# Altium PCB EFR32xG1x_DISC_WIDEBAND_REF_DES_A00_PCB_ASCII.PcbDoc (part 1 of 2)
Units mm, origin at the board's own origin, x right, y up, seen from the top; angles counter-clockwise.
Board outline 30 x 45 mm, 4 copper layers (Top Layer, Signal Layer 2, Signal Layer 3, Bottom Layer), stack 1.606 mm thick; 90 components, 90 nets, 338 pads, 387 vias.
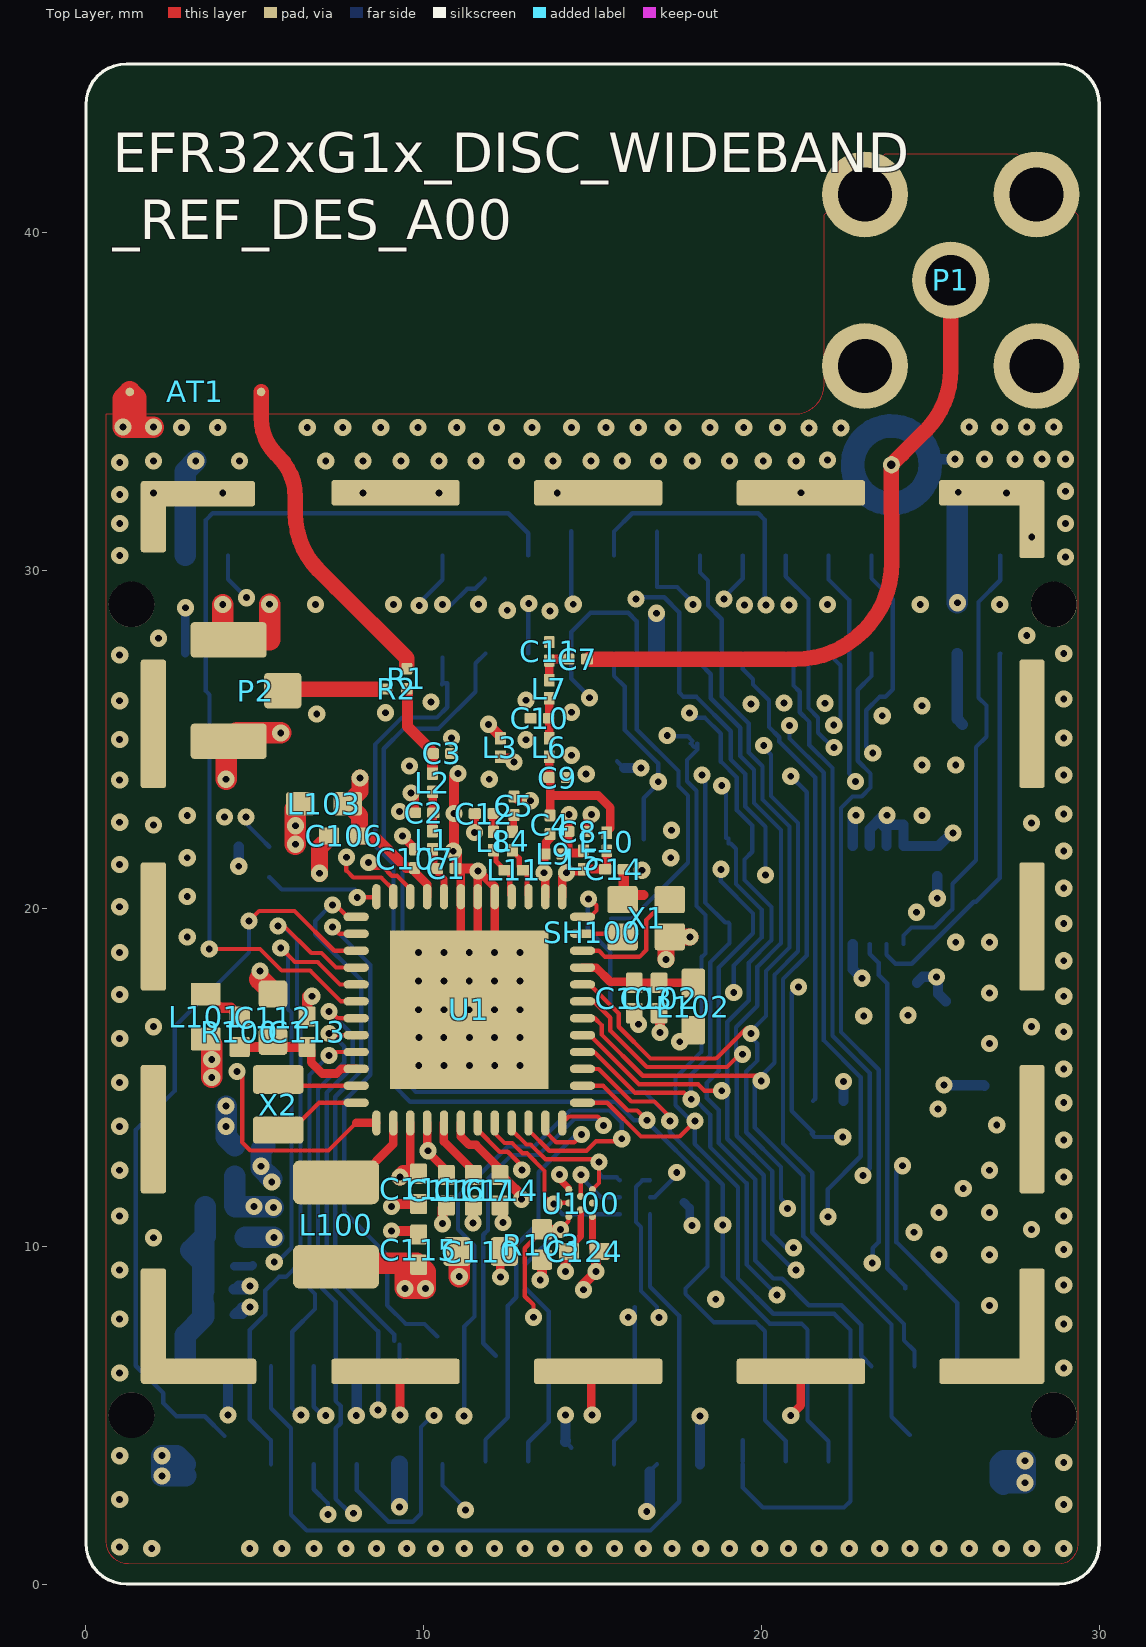
[diagram p0: Top Layer view]
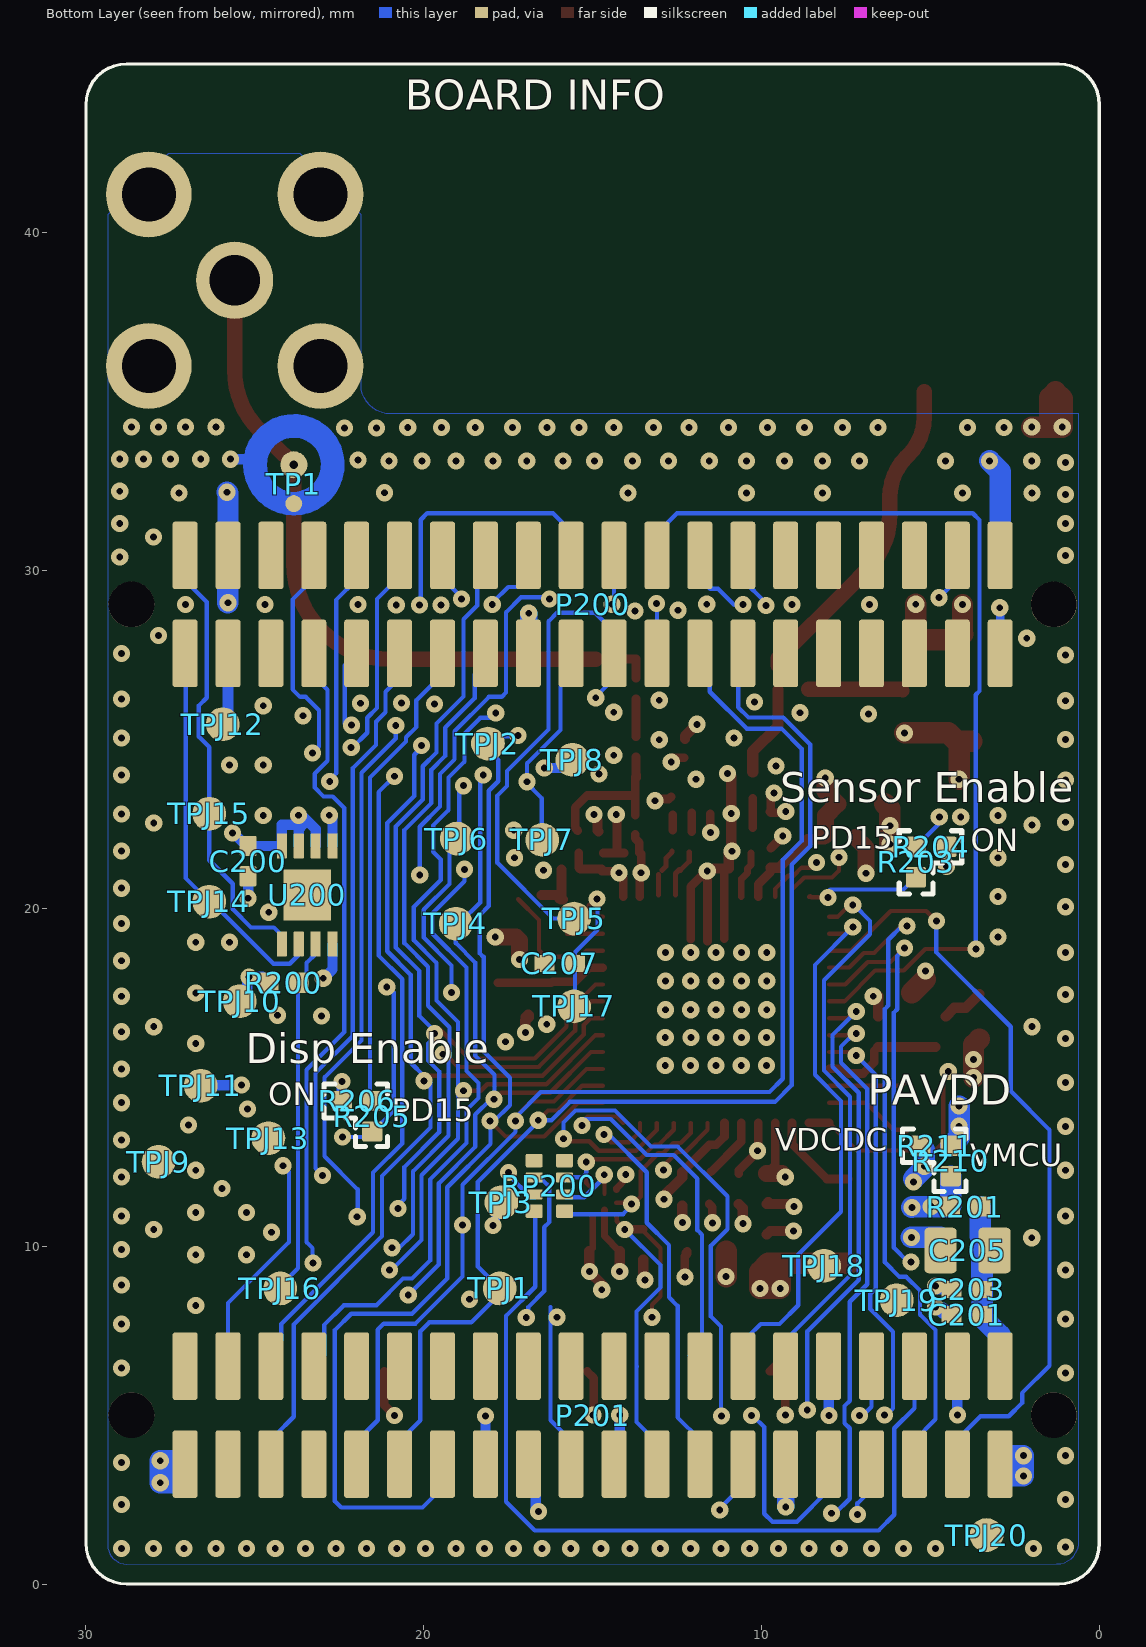
[diagram p1: Bottom Layer view, seen from below]
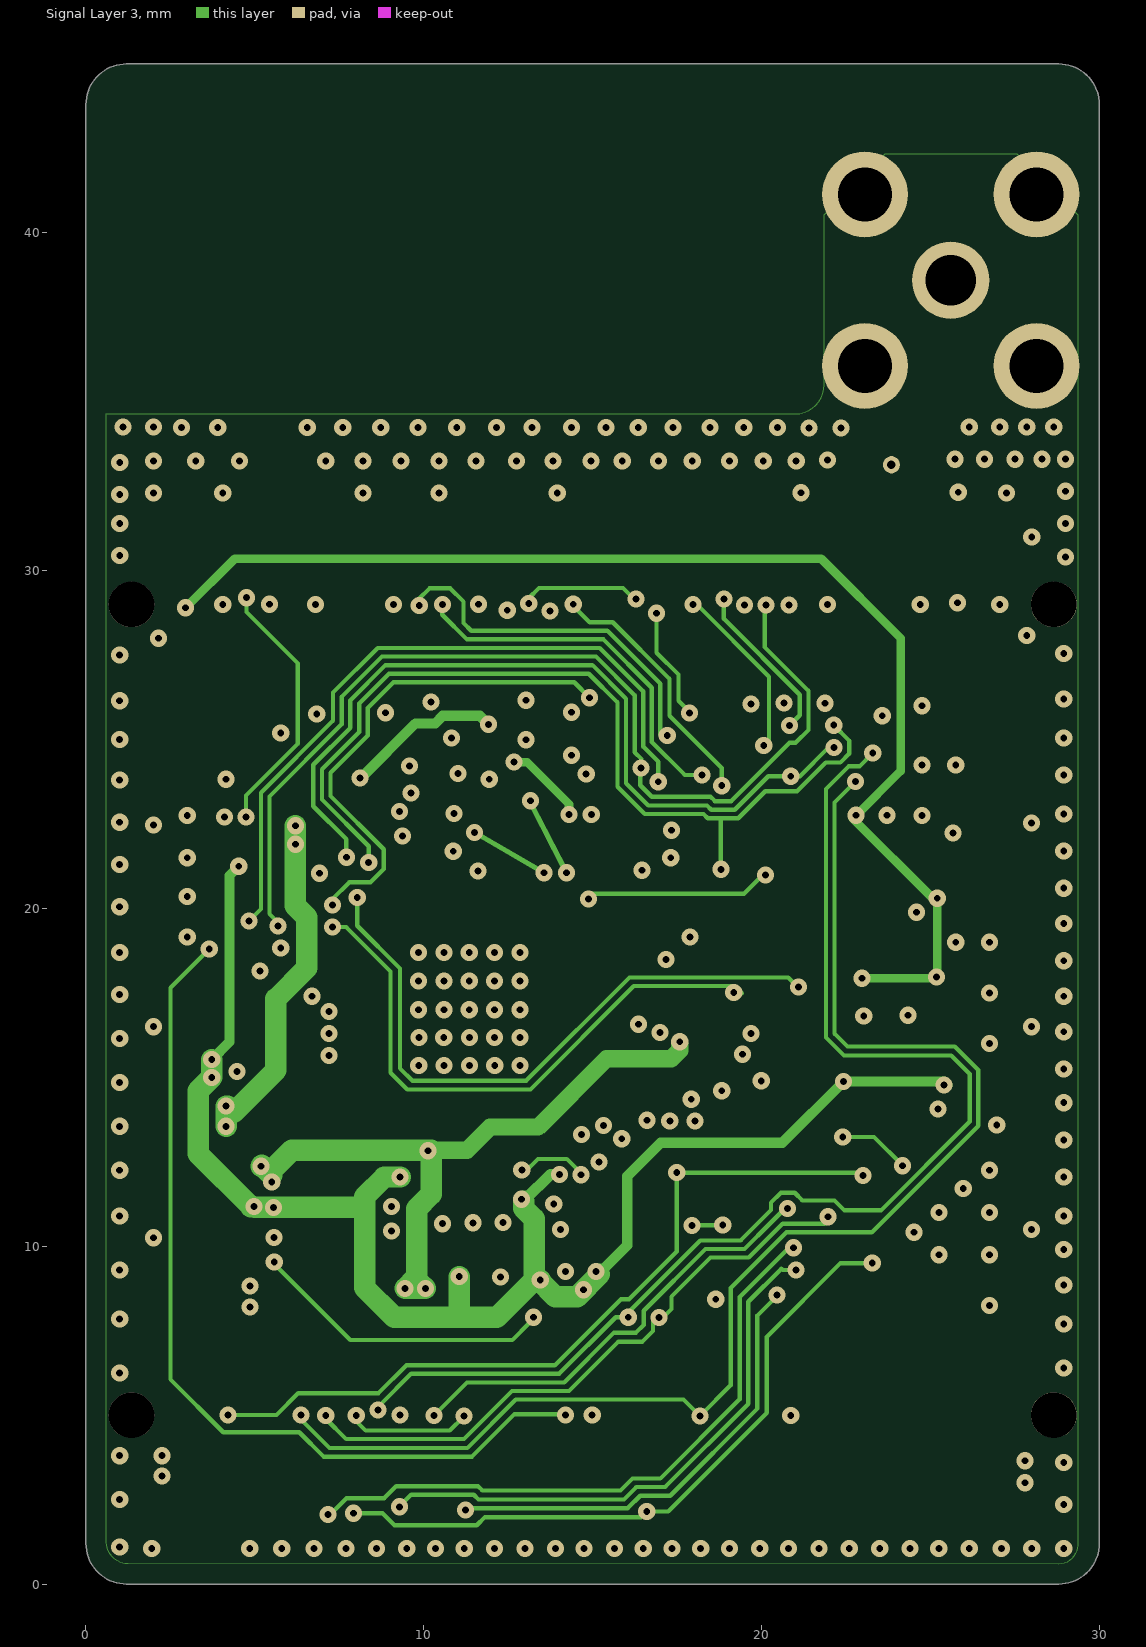
[diagram p2: Signal Layer 3]

## Layer stack, top to bottom
Top Solder: solder mask 0.01, Solder Resist, Dk 3.5
Top Layer: signal copper 0.035
Dielectric 1: core 0.3, FR-4, Dk 4.2
Signal Layer 2: signal copper 0.018
Dielectric 3: prepreg 0.9, Dk 4.2
Signal Layer 3: signal copper 0.018
Dielectric 2: core 0.3, FR-4, Dk 4.2
Bottom Layer: signal copper 0.035
Bottom Solder: solder mask 0.01, Solder Resist, Dk 3.5

## Board outline
0,1.2 ccw(c1.2,1.2) 1.2,0 28.8,0 ccw(c28.8,1.2) 30,1.2 30,43.8 ccw(c28.8,43.8) 28.8,45 1.2,45 ccw(c1.2,43.8) 0,43.8

## Design rules (kind name [scope] priority, off if disabled: settings)
AcuteAngle [All] p0: scope1count=1 scope1_0_kind=Board scope1_0_value=Board scope2count=1 scope2_0_kind=Board scope2_0_value=Board commentlength=0 minimum=6.50000000000000E+0001
AcuteAngle [All] p1: minimum=6.50000000000000E+0001 checktracksonly=FALSE
AssemblyTestPointUsage [All] p0: scope1count=1 scope1_0_kind=Board scope1_0_value=Board scope2count=1 scope2_0_kind=Board scope2_0_value=Board commentlength=0
AssemblyTestpoint [All] p0: scope1count=1 scope1_0_kind=Board scope1_0_value=Board scope2count=1 scope2_0_kind=Board scope2_0_value=Board commentlength=0
BoardOutlineClearance [All] p0: scope1count=1 scope1_0_kind=Board scope1_0_value=Board scope2count=1 scope2_0_kind=Board scope2_0_value=Board commentlength=0 gap=0.5
BoardOutlineClearance [All] p1: gap=0.5
Clearance Clearance_NPTH [All] p0: scope1count=1 scope1_0_kind=PadClass scope1_0_value=NPTH scope2count=1 scope2_0_kind=Board scope2_0_value=Board commentlength=0 gap=0.254
Clearance 50Ohm [All] p0: scope1count=1 scope1_0_kind=NetClass scope1_0_value=50Ohm scope2count=1 scope2_0_kind=Net scope2_0_value=GND commentlength=0 gap=0.254
Clearance Clearance_Net_AT1_1 [All] p0: scope1count=1 scope1_0_kind=Net scope1_0_value=NetAT1_1 scope2count=1 scope2_0_kind=Board scope2_0_value=Board commentlength=0 gap=0.25
Clearance Clearance_NetP2_1 [All] p0: scope1count=1 scope1_0_kind=Net scope1_0_value=NetP2_1 scope2count=1 scope2_0_kind=Board scope2_0_value=Board commentlength=0 gap=0.25
Clearance Clearance_NetC8 [All] p0: scope1count=1 scope1_0_kind=Net scope1_0_value=NetC8_1 scope2count=1 scope2_0_kind=Board scope2_0_value=Board commentlength=0 gap=0.25
Clearance [All] p0: scope1count=1 scope1_0_kind=Board scope1_0_value=Board scope2count=1 scope2_0_kind=Board scope2_0_value=Board commentlength=0 gap=0.127
Clearance 50Ohm [InNetClass('50Ohm') vs InNet('GND')] p1: gap=0.254
Clearance Clearance_NPTH [InPadClass('NPTH')] p2: gap=0.254
Clearance [All] p3: gap=0.127
Clearance Clearance_NetP2_1 [InNet('NetP2_1')] p4: gap=0.25
Clearance Clearance_NetC8 [InNet('NetC8_1')] p5: gap=0.25
Clearance Clearance_Net_AT1_1 [InNet('NetAT1_1')] p6: gap=0.25
ComponentClearance [All] p0 off: scope1count=1 scope1_0_kind=Board scope1_0_value=Board scope2count=1 scope2_0_kind=Board scope2_0_value=Board commentlength=0 gap=0.254 collisioncheckmode=3
ComponentClearance [All] p1 off: gap=0.254 collisioncheckmode=3 verticalgap=0.254 showdistances=FALSE
DiffPairsRouting [All] p0: scope1count=1 scope1_0_kind=Board scope1_0_value=Board scope2count=1 scope2_0_kind=Board scope2_0_value=Board commentlength=0
FabricationTestPointUsage [All] p0: scope1count=1 scope1_0_kind=Board scope1_0_value=Board scope2count=1 scope2_0_kind=Board scope2_0_value=Board commentlength=0 valid=0 allowmultiple=FALSE
FabricationTestpoint [All] p0: scope1count=1 scope1_0_kind=Board scope1_0_value=Board scope2count=1 scope2_0_kind=Board scope2_0_value=Board commentlength=0 side=3 testpointundercomponent=TRUE minsize=1.016 maxsize=2.54 preferedsize=1.524 minholesize=0 maxholesize=1.016 preferedholesize=0.813 testpointgrid=0.025
FanoutControl Fanout_BGA [All] p0 off: scope1count=1 scope1_0_kind=Board scope1_0_value=Board scope2count=1 scope2_0_kind=Board scope2_0_value=Board commentlength=69 // Protel DXP Scope 1 Expression Was: IsBGA   Fanout_BGA (Default Rule)
FanoutControl Fanout_LCC [All] p0 off: scope1count=1 scope1_0_kind=Board scope1_0_value=Board scope2count=1 scope2_0_kind=Board scope2_0_value=Board commentlength=69 // Protel DXP Scope 1 Expression Was: IsLCC   Fanout_LCC (Default Rule)
FanoutControl Fanout_SOIC [All] p0 off: scope1count=1 scope1_0_kind=Board scope1_0_value=Board scope2count=1 scope2_0_kind=Board scope2_0_value=Board commentlength=71 // Protel DXP Scope 1 Expression Was: IsSOIC   Fanout_SOIC (Default Rule)
FanoutControl Fanout_Small [All] p0 off: scope1count=1 scope1_0_kind=Board scope1_0_value=Board scope2count=1 scope2_0_kind=Board scope2_0_value=Board commentlength=84 // Protel DXP Scope 1 Expression Was: (CompPinCount < 5)   Fanout_Small (Default Rule)
FanoutControl Fanout_Default [All] p0: scope1count=1 scope1_0_kind=Board scope1_0_value=Board scope2count=1 scope2_0_kind=Board scope2_0_value=Board commentlength=30 // Fanout_Default (Default Rule)
Height [All] p0: scope1count=1 scope1_0_kind=Board scope1_0_value=Board scope2count=1 scope2_0_kind=Board scope2_0_value=Board commentlength=0
HoleSize [All] p0: scope1count=1 scope1_0_kind=Board scope1_0_value=Board scope2count=1 scope2_0_kind=Board scope2_0_value=Board commentlength=0 absolutevalues=TRUE maxlimit=2.54 minlimit=0.025 maxpercent=80.000 minpercent=20.000
HoleToHoleClearance HoleToHoleClearance_ANT1toPAD [All] p0 off: scope1count=1 scope1_0_kind=Board scope1_0_value=Board scope2count=1 scope2_0_kind=Board scope2_0_value=Board commentlength=44 // Protel DXP Scope 2 Expression Was: ISpad
HoleToHoleClearance [All] p0: scope1count=1 scope1_0_kind=Board scope1_0_value=Board scope2count=1 scope2_0_kind=Board scope2_0_value=Board commentlength=0
HoleToHoleClearance HoleToHoleClearance_U1toVIA_1 [All] p0 off: scope1count=1 scope1_0_kind=Board scope1_0_value=Board scope2count=1 scope2_0_kind=Board scope2_0_value=Board commentlength=44 // Protel DXP Scope 2 Expression Was: IsVia
HoleToHoleClearance HoleToHoleClearance_ANT1toPAD [Incomponent ('ANT1') vs ISpad] p1: gap=0 allowstackedmicrovias=TRUE
HoleToHoleClearance HoleToHoleClearance_U1toVIA_1 [InComponent ('U1') vs IsVia] p2: gap=0 allowstackedmicrovias=TRUE
HoleToHoleClearance [All] p3: gap=0.254 allowstackedmicrovias=TRUE
LayerPairs [All] p0: scope1count=1 scope1_0_kind=Board scope1_0_value=Board scope2count=1 scope2_0_kind=Board scope2_0_value=Board commentlength=0 enforce=TRUE
MinimumSolderMaskSliver [All] p0: scope1count=1 scope1_0_kind=Board scope1_0_value=Board scope2count=1 scope2_0_kind=Board scope2_0_value=Board commentlength=0
MinimumSolderMaskSliver [All] p1: minsoldermaskwidth=0.102
NetAntennae [All] p0: scope1count=1 scope1_0_kind=Board scope1_0_value=Board scope2count=1 scope2_0_kind=Board scope2_0_value=Board commentlength=0
PasteMaskExpansion [All] p0: scope1count=1 scope1_0_kind=Board scope1_0_value=Board scope2count=1 scope2_0_kind=Board scope2_0_value=Board commentlength=0 expansion=0
PlaneClearance [All] p0: scope1count=1 scope1_0_kind=Board scope1_0_value=Board scope2count=1 scope2_0_kind=Board scope2_0_value=Board commentlength=0 clearance=0.508
PlaneConnect [All] p0: scope1count=1 scope1_0_kind=Board scope1_0_value=Board scope2count=1 scope2_0_kind=Board scope2_0_value=Board commentlength=0 planeconnectstyle=Relief reliefexpansion=0.508 reliefentries=4 reliefconductorwidth=0.254 reliefairgap=0.254
PolygonConnect PolygonConnect_GND [All] p0: scope1count=1 scope1_0_kind=Net scope1_0_value=GND scope2count=1 scope2_0_kind=Board scope2_0_value=Board commentlength=0 connectstyle=Relief reliefconductorwidth=0.203 reliefentries=4 polygonreliefangle="90 Angle"
PolygonConnect PolygonConnect_P1 [All] p0: scope1count=1 scope1_0_kind=Component scope1_0_value=P1 scope2count=1 scope2_0_kind=Board scope2_0_value=Board commentlength=0 connectstyle=Relief reliefconductorwidth=0.305 reliefentries=4 polygonreliefangle="90 Angle"
PolygonConnect PolygonConnect_SH100 [All] p0: scope1count=1 scope1_0_kind=Component scope1_0_value=SH100 scope2count=1 scope2_0_kind=Board scope2_0_value=Board commentlength=0 connectstyle=Direct reliefconductorwidth=0.254 reliefentries=4 polygonreliefangle="90 Angle"
PolygonConnect Polygon_VIA_Connect [All] p0 off: scope1count=1 scope1_0_kind=Board scope1_0_value=Board scope2count=1 scope2_0_kind=Board scope2_0_value=Board commentlength=44 connectstyle=Direct reliefconductorwidth=0.254 reliefentries=4 polygonreliefangle="90 Angle" // Protel DXP Scope 1 Expression Was: IsVia
PolygonConnect PolygonConnect_SH100 [InComponent('SH100')] p1: connectstyle=Direct reliefconductorwidth=0.254 reliefentries=4 polygonreliefangle="90 Angle" airgapwidth=0.127
PolygonConnect PolygonConnect_P1 [InComponent('P1')] p2: connectstyle=Relief reliefconductorwidth=0.305 reliefentries=4 polygonreliefangle="90 Angle" airgapwidth=0.127
PolygonConnect Polygon_VIA_Connect [IsVia] p3: connectstyle=Direct reliefconductorwidth=0.254 reliefentries=4 polygonreliefangle="90 Angle" airgapwidth=0.254
PolygonConnect PolygonConnect_GND [InNet('GND')] p4: connectstyle=Relief reliefconductorwidth=0.203 reliefentries=4 polygonreliefangle="90 Angle" airgapwidth=0.127
RoutingCorners [All] p0: scope1count=1 scope1_0_kind=Board scope1_0_value=Board scope2count=1 scope2_0_kind=Board scope2_0_value=Board commentlength=0 cornerstyle=45-Degree minsetback=2.54 maxsetback=2.54
RoutingLayers [All] p0: scope1count=1 scope1_0_kind=Board scope1_0_value=Board scope2count=1 scope2_0_kind=Board scope2_0_value=Board commentlength=0 top layer=Automatic mid layer 1=Automatic mid layer 2=Automatic bottom layer=Automatic
RoutingPriority [All] p0: scope1count=1 scope1_0_kind=Board scope1_0_value=Board scope2count=1 scope2_0_kind=Board scope2_0_value=Board commentlength=0
RoutingTopology [All] p0: scope1count=1 scope1_0_kind=Board scope1_0_value=Board scope2count=1 scope2_0_kind=Board scope2_0_value=Board commentlength=0 topology=Shortest
RoutingVias [All] p0: scope1count=1 scope1_0_kind=Board scope1_0_value=Board scope2count=1 scope2_0_kind=Board scope2_0_value=Board commentlength=0 holewidth=0.25 width=0.508 viastyle="Through Hole" minholewidth=0.25 minwidth=0.508 maxholewidth=1 maxwidth=1.5
RoutingVias [All] p1: holewidth=0.25 width=0.508 viastyle="Through Hole" minholewidth=0.25 minwidth=0.508 maxholewidth=1 maxwidth=1.5
ShortCircuit [All] p0 off: scope1count=1 scope1_0_kind=Board scope1_0_value=Board scope2count=1 scope2_0_kind=Board scope2_0_value=Board commentlength=44 allowed=TRUE // Protel DXP Scope 2 Expression Was: ispad
ShortCircuit [IsVia vs ispad] p1: allowed=TRUE
SilkToBoardRegionClearance [All] p0: scope1count=1 scope1_0_kind=Board scope1_0_value=Board scope2count=1 scope2_0_kind=Board scope2_0_value=Board commentlength=0
SilkToSilkClearance [All] p0: scope1count=1 scope1_0_kind=Board scope1_0_value=Board scope2count=1 scope2_0_kind=Board scope2_0_value=Board commentlength=0
SilkToSilkClearance [All] p1: silktosilkclearance=0.102
SilkToSolderMaskClearance [All] p0 off: scope1count=1 scope1_0_kind=Board scope1_0_value=Board scope2count=1 scope2_0_kind=Board scope2_0_value=Board commentlength=44 // Protel DXP Scope 1 Expression Was: IsPad
SilkToSolderMaskClearance [IsPad] p1: minsilkscreentomaskgap=0.102 clearancetoexposedcopper=TRUE
SolderMaskExpansion [All] p0: scope1count=1 scope1_0_kind=Board scope1_0_value=Board scope2count=1 scope2_0_kind=Board scope2_0_value=Board commentlength=0 expansion=0.051
SolderMaskExpansion [All] p1: expansion=0.051
UnRoutedNet [All] p0: scope1count=1 scope1_0_kind=Board scope1_0_value=Board scope2count=1 scope2_0_kind=Board scope2_0_value=Board commentlength=0
UnpouredPolygon [All] p0: scope1count=1 scope1_0_kind=Board scope1_0_value=Board scope2count=1 scope2_0_kind=Board scope2_0_value=Board commentlength=0
Width [All] p0: scope1count=1 scope1_0_kind=Board scope1_0_value=Board scope2count=1 scope2_0_kind=Board scope2_0_value=Board commentlength=0 maxlimit=5.08 minlimit=0.102 preferedwidth=0.127
Width [All] p1: maxlimit=5.08 minlimit=0.102 preferedwidth=0.127
24 further rules are at their usual default settings.

## Classes and differential pairs
net class 50Ohm: NetAT1_1 NetP2_1 Tline
pad class NPTH: P200-M1 P200-M2 P201-M1 P201-M2
component class "01_ Title Page": PCB1
component class "02_ RF, Antenna & Power": AT1 C1 C2 C3 C4 C5 C7 C8 C9 C10 C11 C12 C14 C102 C103 C106 C107 C110 C111 C112 C113 C114 C115 C116 C117 L1 L2 L3 L4 L5 L6 L7 L8 L9 L10 L11 L100 L101 L102 L103 P1 P2 R1 R2 R100 R210 R211 SH100 TP1 X1 X2
component class "03_ EFR32 Signal Assign": C124 C207 R103 R203 R204 R205 R206 RP200 U1 U100
component class "04_ WSTK Connectors & B": C200 C201 C203 C205 P200 P201 R200 R201 TPJ1 TPJ2 TPJ3 TPJ4 TPJ5 TPJ6 TPJ7 TPJ8 TPJ9 TPJ10 TPJ11 TPJ12 TPJ13 TPJ14 TPJ15 TPJ16 TPJ17 TPJ18 TPJ19 TPJ20 U200
net class RADIO_PA[5..0]: RADIO_PA0 RADIO_PA1 RADIO_PA2 RADIO_PA3 RADIO_PA4 RADIO_PA5
net class RADIO_PB[15..11]: RADIO_PB11 RADIO_PB12 RADIO_PB13 RADIO_PB14 RADIO_PB15
net class RADIO_PC[11..6]: RADIO_PC6 RADIO_PC7 RADIO_PC8 RADIO_PC9 RADIO_PC10 RADIO_PC11
net class RADIO_PD[15..13]: RADIO_PD13 RADIO_PD14 RADIO_PD15
net class RADIO_PF[7..0]: RADIO_PF0 RADIO_PF1 RADIO_PF2 RADIO_PF3 RADIO_PF4 RADIO_PF5 RADIO_PF6 RADIO_PF7
net class WSTK_F[21..0]: WSTK_F4 WSTK_F14 WSTK_F15 WSTK_F16
net class WSTK_P[45..0]: WSTK_P3 WSTK_P15 WSTK_P17 WSTK_P19 WSTK_P21 WSTK_P23 WSTK_P25 WSTK_P27 WSTK_P29 WSTK_P30 WSTK_P34 WSTK_P36 WSTK_P37 WSTK_P38 WSTK_P39 WSTK_P40 WSTK_P41 WSTK_P42 WSTK_P43 WSTK_P44 WSTK_P45

## Components (designator, comment, footprint, x,y, rotation, side; value= is the part's Value field where it differs from the comment)
AT1 "INVERTED_F" ANT_INV_F_2.4_GHZ_17.3MM_MIR 0.79,34.84 r0 top locked net-tie
C1 "?" C0201_L 10.668,21.184 r180 top
C2 "?" C0201_L 10.008,22.835 r0 top
C3 "?" C0201_L 10.541,24.587 r180 top
C4 "?" C0201_L 13.741,22.479 r90 top
C5 "?" C0201_L 12.675,23.038 r90 top
C7 "?" C0201_L 14.554,27.381 r0 top
C8 "?" C0201_L 14.554,22.276 r180 top
C9 "?" C0201_L 13.97,23.876 r0 top
C10 "?" C0201_L 13.437,25.629 r180 top
C11 "?" C0201_L 13.716,27.61 r90 top
C12 "?" C0201_L 11.786,22.809 r180 top
C14 "?" C0201_L 15.646,21.158 r0 top
C102 "100P" C0402_L 16.967,17.348 r270 top
C103 "10P" C0402_L 16.231,17.348 r270 top
C106 "220N" C0402_L 7.645,22.149 r180 top
C107 "10P" C0201_L 9.728,21.476 r90 top
C110 "10U" C0603_L 11.684,9.842 r0 top
C111 "1U" C0402_L 9.848,11.7 r270 top
C112 "10U" C0603_L 5.537,16.764 r90 top
C113 "10N" C0402_L 6.548,16.35 r90 top
C114 "1U" C0402_L 12.255,11.659 r270 top
C115 "1U" C0402_L 9.85,9.9 r90 top
C116 "100N" C0402_L 10.668,11.659 r270 top
C117 "1U" C0402_L 11.468,11.659 r270 top
C124 "100N" C0402_L 14.75,9.85 r180 top
C200 "100N" C0402_L 25.2,21.4 r90 bottom
C201 "100N" C0402_L 3.925,7.975 r0 bottom
C203 "100N" C0402_L 3.925,8.725 r0 bottom
C205 "10U" C0805_L 3.9,9.875 r0 bottom
C207 "100N" C0402_L 15.975,18.375 r0 bottom
L1 "?" L0201_L 10.262,22.022 r90 top
L2 "?" L0201_L 10.262,23.724 r90 top
L3 "?" L0201_L 12.268,24.765 r90 top
L4 "?" L0201_L 12.624,21.996 r270 top
L5 "?" L0201_L 14.732,21.438 r270 top
L6 "?" L0201_L 13.716,24.765 r270 top
L7 "?" L0201_L 13.716,26.492 r270 top
L8 "?" L0201_L 12.065,21.996 r270 top
L9 "?" L0201_L 13.843,21.615 r180 top
L10 "?" L0201_L 15.418,21.971 r270 top
L11 "?" L0201_L 12.675,21.133 r0 top
L100 "4U7" COIL_MUR_LQH3NP_1212 7.404,10.643 r270 top
L101 "CBF102WB" WURTH_CBF_0603 3.55,16.8 r90 top
L102 "BLM18AG601SN1" COIL_MUR_BLM18_0603 17.983,17.094 r90 top
L103 "BLM18AG601SN1" COIL_MUR_BLM18_0603 7.05,23.1 r0 top
P1 "SMA" TE_SMA_1814832_TH_VER 25.6,38.6 r0 top locked
P2 "U.FL" COAX_HIROSE_U.FL_CL331-0471 4.225,26.45 r270 top
P200 "SOCKET_2X20_1.27MM_SMD" SAM_SFC-120-T2-D-A-2X20_SNUM 15,29 r0 bottom
P201 "SOCKET_2X20_1.27MM_SMD" SAM_SFC-120-T2-D-A-2X20_SNUM 15,5 r0 bottom
R1 "0R" R0201_L 9.5,26.8 r90 top
R2 "0R" R0201_L 9.2,26.5 r180 top
R100 "1R" R0402_L 4.55,16.35 r270 top
R103 "330K" R0402_L 13.5,10.05 r90 top
R200 "10K" R0402_L 24.15,17.8 r0 bottom
R201 "0R" R0402_L 3.975,11.175 r0 bottom
R203 "0R" R0402_L 5.425,21.375 r90 bottom
R204 "0R" R0402_L 4.975,21.825 r0 bottom
R205 "0R" R0402_L 21.525,13.85 r90 bottom
R206 "0R" R0402_L 21.975,14.3 r180 bottom
R210 "0R" R0402_L 4.4,12.525 r270 bottom
R211 "0R" R0402_L 4.85,12.975 r0 bottom
RP200 "100R" RES_MNR04-8 16.281,11.786 r90 bottom
SH100 "RF_SHIELD_FRAME_BMI-S-203-F" RF_SHIELD_FRAME_BMI-S-203-F_PCB4100 15,19.3 r0 top locked
TP1 "RF_TEST_POINT" "TP_INGUN_50_OHM_CLOSED OPENVIA" 23.845,33.135 r180 bottom
TPJ1 "TPJ_SMD" TP_1.0_SMD 17.75,8.75 r90 bottom
TPJ2 "TPJ_SMD" TP_1.0_SMD 18.1,24.88 r90 bottom
TPJ3 "TPJ_SMD" TP_1.0_SMD 17.7,11.3 r90 bottom
TPJ4 "TPJ_SMD" TP_1.0_SMD 19.05,19.55 r90 bottom
TPJ5 "TPJ_SMD" TP_1.0_SMD 15.55,19.7 r90 bottom
TPJ6 "TPJ_SMD" TP_1.0_SMD 19.02,22.07 r90 bottom
TPJ7 "TPJ_SMD" TP_1.0_SMD 16.49,22.03 r90 bottom
TPJ8 "TPJ_SMD" TP_1.0_SMD 15.6,24.4 r90 bottom
TPJ9 "TPJ_SMD" TP_1.0_SMD 27.85,12.5 r90 bottom
TPJ10 "TPJ_SMD" TP_1.0_SMD 25.45,17.25 r90 bottom
TPJ11 "TPJ_SMD" TP_1.0_SMD 26.6,14.75 r90 bottom
TPJ12 "TPJ_SMD" TP_1.0_SMD 25.95,25.45 r90 bottom
TPJ13 "TPJ_SMD" TP_1.0_SMD 24.6,13.2 r90 bottom
TPJ14 "TPJ_SMD" TP_1.0_SMD 26.35,20.2 r90 bottom
TPJ15 "TPJ_SMD" TP_1.0_SMD 26.35,22.8 r90 bottom
TPJ16 "TPJ_SMD" TP_1.0_SMD 24.25,8.75 r90 bottom
TPJ17 "TPJ_SMD" TP_1.0_SMD 15.55,17.1 r90 bottom
TPJ18 "TPJ_SMD" TP_1.0_SMD 8.15,9.42 r90 bottom
TPJ19 "TPJ_SMD" TP_1.0_SMD 6,8.4 r90 bottom
TPJ20 "TPJ_SMD" TP_1.0_SMD 3.34,1.45 r90 bottom
U1 "EFR32MG1P233F256GM48" QFN48_M050_SQ7.0_EP_SL_L 11.35,17 r180 top
U100 "MX25R8035F" BGA8_M040_1.24X1.75_WLCSP 14.643,11.278 r180 top
U200 "24AA024" TDFN8_M050_2.0X3.0_EP 23.45,20.4 r0 bottom
X1 "38.400 MHz" X_SSS_DSX211SH_2.05X1.65-4 16.586,19.71 r0 top
X2 "32.768kHz" X_MCS_CM8V-T1A 5.69,14.186 r90 top

## Footprints (in the part's own frame and the unit in brackets; to place one, negate y for a bottom-side part, rotate by r counter-clockwise, add the part's x,y. Pads: shape width x height; smd on the part's side, far side on the other; paste and mask are expansions set on the pad)
ANT_INV_F_2.4_GHZ_17.3MM_MIR [mil] "Antenna inverted F, 2.4 GHz, 17.3 mm (MIR)"
  round 10 smd paste-5.04 mask+0: 1(173,17.72) 2(20.01,17.72)
BGA8_M040_1.24X1.75_WLCSP [mm] "BGA, 8 pin. U100"
  round 0.21 smd mask+0: A1(-0.35,0.4) A3(0.35,0.4) B2(0,0.2) C1(-0.35,0) C3(0.35,0) D2(0,-0.2) E1(-0.35,-0.4) E3(0.35,-0.4)
C0201_L [mm] "Capacitor"
  rrect25% 0.36x0.32 smd: 1(-0.275,0) 2(0.275,0)
C0402_L [mm] "Chip Capacitor, 2-Leads, Body 1.0x0.5mm, IPC High Density"
  rrect20% 0.6x0.5 smd mask+0: 1(-0.45,0) 2(0.45,0)
C0603_L [mm] "Capacitor, 0603, High Density (C)"
  rrect25% 0.8x0.85 smd: 1(-0.7,0) 2(0.7,0)
C0805_L [mm] "Capacitor, 0805"
  rrect25% 0.95x1.35 smd: 1(-0.8,0) 2(0.8,0)
COAX_HIROSE_U.FL_CL331-0471 [mm] "COAX_HIROSE_U.FL_CL331-0471"
  rrect20% 1.05x1.1 smd mask+0: 1(0,1.6)
  rrect20% 1.05x2.25 smd mask+0: 2(-1.5,0) 3(1.5,0)
COIL_MUR_BLM18_0603 [mm] "COIL_MUR_BLM18P_0603"
  rrect25% 0.85x0.7 smd mask+0: 1(-0.7,0) 2(0.7,0)
COIL_MUR_LQH3NP_1212 [mm] "COIL_MUR_LQH3NP_1212"
  rrect30% 1.3x2.55 smd mask+0: 1(-1.25,0) 2(1.25,0)
L0201_L [mm] "Inductor, 0201, High Density (C)"
  rrect10% 0.37x0.32 smd: 1(-0.27,0) 2(0.27,0)
QFN48_M050_SQ7.0_EP_SL_L [mm] "QFN48_M050_SQ7.0_EP, SiLabs, High Density (C)"
  rect 4.7x4.7 smd paste-4.7: 0(0,0)
  oval 0.75x0.25 smd: 1(-3.35,2.75) 2(-3.35,2.25) 3(-3.35,1.75) 4(-3.35,1.25) 5(-3.35,0.75) 6(-3.35,0.25) 7(-3.35,-0.25) 8(-3.35,-0.75) 9(-3.35,-1.25) 10(-3.35,-1.75) 11(-3.35,-2.25) 12(-3.35,-2.75) 25(3.35,-2.75) 26(3.35,-2.25) 27(3.35,-1.75) 28(3.35,-1.25) 29(3.35,-0.75) 30(3.35,-0.25) 31(3.35,0.25) 32(3.35,0.75) 33(3.35,1.25) 34(3.35,1.75) 35(3.35,2.25) 36(3.35,2.75)
  oval 0.25x0.75 smd: 13(-2.75,-3.35) 14(-2.25,-3.35) 15(-1.75,-3.35) 16(-1.25,-3.35) 17(-0.75,-3.35) 18(-0.25,-3.35) 19(0.25,-3.35) 20(0.75,-3.35) 21(1.25,-3.35) 22(1.75,-3.35) 23(2.25,-3.35) 24(2.75,-3.35) 37(2.75,3.35) 38(2.25,3.35) 39(1.75,3.35) 40(1.25,3.35) 41(0.75,3.35) 42(0.25,3.35) 43(-0.25,3.35) 44(-0.75,3.35) 45(-1.25,3.35) 46(-1.75,3.35) 47(-2.25,3.35) 48(-2.75,3.35)
  rrect50% 1.9x1.9 on Top Paste mask+0: 49(-1.15,1.15) 49(-1.15,-1.15) 49(1.15,1.15) 49(1.15,-1.15)
R0201_L [mm] "Resistor (Chip2PinSM127P600-8N)"
  rrect25% 0.34x0.32 smd: 1(-0.3,0) 2(0.3,0)
R0402_L [mm] "Chip Resistor, 2-Leads, Body 1.0x0.5mm, IPC High Density"
  rrect20% 0.6x0.6 smd mask+0: 1(-0.45,0) 2(0.45,0)
RES_MNR04-8 [mm] "Chip resistor network 8pin"
  rrect20% 0.4x0.5 smd mask+0: 1(-0.75,-0.45) 4(0.75,-0.45) 5(0.75,0.45) 8(-0.75,0.45)
  rrect20% 0.3x0.5 smd mask+0: 2(-0.25,-0.45) 3(0.25,-0.45) 6(0.25,0.45) 7(-0.25,0.45)
RF_SHIELD_FRAME_BMI-S-203-F_PCB4100 [mm] "RF_SHIELD_FRAME_BMI-S-203-F"
  rrect20% 0.75x3.8 smd paste+0 mask+0: 1(-13.005,-5.835) 1(-13.005,0.165) 1(-13.005,6.165) 1(13.005,-5.835) 1(13.005,0.165) 1(13.005,6.165)
  rrect20% 0.75x3.4 smd paste+0 mask+0: 1(-13.005,-11.659) 1(13.005,-11.659)
  rrect20% 0.75x2.1 smd paste+0 mask+0: 1(-13.005,12.294)
  oval 0.75x0.254 smd paste+0 mask+0: 1(-13.004,12.994) 1(12.994,12.994) 1(12.994,12.994) 1(12.994,12.994)
  rrect20% 3.375x0.75 smd paste+0 mask+0: 1(-11.684,12.979)
  rrect20% 3.4x0.75 smd paste+0 mask+0: 1(-11.659,-13.005)
  rrect20% 3.8x0.75 smd paste+0 mask+0: 1(-5.835,-13.005) 1(-5.835,13.005) 1(0.165,-13.005) 1(0.165,13.005) 1(6.165,-13.005) 1(6.165,13.005)
  rrect20% 3.1x0.75 smd paste+0 mask+0: 1(11.811,-13.005)
  rrect20% 3.125x0.75 smd paste+0 mask+0: 1(11.811,13.005)
  rrect20% 0.75x2.3 smd paste+0 mask+0: 1(13.005,12.217)
SAM_SFC-120-T2-D-A-2X20_SNUM [mm]
  rrect20% 0.74x2 smd mask+0: 1(-12.065,1.45) 2(-12.065,-1.45) 3(-10.795,1.45) 4(-10.795,-1.45) 5(-9.525,1.45) 6(-9.525,-1.45) 7(-8.255,1.45) 8(-8.255,-1.45) 9(-6.985,1.45) 10(-6.985,-1.45) 11(-5.715,1.45) 12(-5.715,-1.45) 13(-4.445,1.45) 14(-4.445,-1.45) 15(-3.175,1.45) 16(-3.175,-1.45) 17(-1.905,1.45) 18(-1.905,-1.45) 19(-0.635,1.45) 20(-0.635,-1.45) 21(0.635,1.45) 22(0.635,-1.45) 23(1.905,1.45) 24(1.905,-1.45) 25(3.175,1.45) 26(3.175,-1.45) 27(4.445,1.45) 28(4.445,-1.45) 29(5.715,1.45) 30(5.715,-1.45) 31(6.985,1.45) 32(6.985,-1.45) 33(8.255,1.45) 34(8.255,-1.45) 35(9.525,1.45) 36(9.525,-1.45) 37(10.795,1.45) 38(10.795,-1.45) 39(12.065,1.45) 40(12.065,-1.45)
  round 1.35 hole 1.35 unplated paste-5.563 mask+0: M1(13.652,0) M2(-13.652,0)
TDFN8_M050_2.0X3.0_EP [mm] "TDFN8_M050_2.0x3.0_EP"
  rrect20% 0.3x0.75 smd mask+0: 1(-0.75,-1.45) 2(-0.25,-1.45) 3(0.25,-1.45) 4(0.75,-1.45) 5(0.75,1.45) 6(0.25,1.45) 7(-0.25,1.45) 8(-0.75,1.45)
  rect 1.4x1.5 smd mask+0: 9(0,0)
TE_SMA_1814832_TH_VER [mm]
  round 2.286 hole 1.5: 1(0,0)
  round 2.54 hole 1.6: 2(-2.54,-2.54) 3(2.54,-2.54) 4(2.54,2.54) 5(-2.54,2.54)
TP_1.0_SMD [mm] "Test Point, 1.0 mm, SMD"
  round 1 smd paste-0.501: 1(0,0)
"TP_INGUN_50_OHM_CLOSED OPENVIA" [mm] "TP_INGUN_50_OHM_CLOSED"
  round 0.8 / inner round 0.508 / far side round 0.508 hole 0.25 mask+0: 1(0,0)
  round 0.5 smd paste-0.255 mask+0: 2(0,-1.15)
  Top Layer lines w0.7: 0,-1.15 cw(c0,0) -1.15,0 cw(c0,0) 0,-1.15
WURTH_CBF_0603 [mm] "COIL_WURTH_CBF_0603_L (= L0603_0.8_L)"
  rrect10% 0.67x0.88 smd: 1(-0.665,0) 2(0.665,0)
X_MCS_CM8V-T1A [mm] "Crystal MCS CM8V-T1A (2 pin)"
  rrect25% 0.8x1.5 smd mask+0: 1(-0.75,0)
  rrect25% 0.85x1.5 smd mask+0: 2(0.75,0)
X_SSS_DSX211SH_2.05X1.65-4 [mm] "X_SSS_DSX211SH_2.05X1.65-4"
  rrect20% 0.9x0.8 smd mask+0: 1(-0.7,-0.55) 2(0.7,-0.55) 3(0.7,0.55) 4(-0.7,0.55)

## Part data
AT1: library part ANT_INVERTED_F
C1 C2 C3 C4 C5 C7 C8 C9 C10 C11 C12 C14 C102 C103 C106 C107 C111 C113 C114 C115 C116 C117 C124 C200 C201 C203 C207: library part C0402
C110 C112: library part C0603
C205: library part C0805
L1 L2 L3 L4 L5 L6 L7 L8 L9 L10 L11: library part L0402
L100: library part LQH3NP
L102 L103: library part BLM18AG
P1: library part SMA_TH
P2: library part HIROSE_U.FL
R1 R2 R100 R103 R200 R201 R203 R204 R205 R206 R210 R211: library part R0402
RP200: library part MNR04M0APJ101
TP1: library part TP_RF
U1: library part EFR32-DUALBAND-QFN48
U100: library part MX25R8035
X1: library part DSX211SH
X2: library part CM8V-T1A

## Via types
v1: diameter 0.508, hole 0.203, Top Layer to Bottom Layer, tented both sides, 387 vias

## Nets (pads, with @x,y where several pads share a name; then routed paths per layer and width w, separated by ;. In a path a pad name is that pad's centre, name@x,y a point inside that pad or via, vN(x,y) a via of type N, cw(c..) or ccw(c..) an arc to the next point about the centre after c; other vN are vias at no path point)
3V3: C200.1 P200.1 R200.2 TPJ10.1 U200.1 U200.8 | length 42.4
  Signal Layer 3 w0.254: v1(2.95,28.9) 4.403,30.353 21.768,30.353 24.117,28.003 24.117,24.067 v1@22.796,22.747 ; v1@22.708,22.658 v1@22.796,22.747 ; v1(22.796,22.758) v1@22.796,22.747 ; v1(22.974,17.932) 25.032,17.932 25.15,18.05 v1@25.163,18.037 ; v1@25.2,18 v1(25.2,20.3) 25.067,20.3 22.711,22.657 22.796,22.743 v1@22.796,22.747
  Bottom Layer w0.254: P200.1@2.935,27.55 2.935,28.885 v1(2.95,28.9)
  Bottom Layer w0.305: U200.8@22.7,18.95 22.7,18.2 22.968,17.932 v1(22.974,17.932) ; U200.1@22.7,21.85 22.7,22.662 v1(22.796,22.758) ; R200.2@24.6,17.8 24.775,17.975 v1(25.175,17.975) 25.225,17.925 25.225,17.475 TPJ10.1@25.45,17.25 ; v1(25.2,20.3) C200.1@25.2,20.95
5V: P200.37 TPJ12.1 | length 2.2
  Bottom Layer w0.33: P200.37@25.795,27.55 25.795,25.605 TPJ12.1@25.95,25.45
BOARD_ID_SCL: P200.39 TPJ14.1 U200.6 | length 11.5
  Bottom Layer w0.127: U200.6@23.7,18.95 23.7,18.629 23.965,18.364 24.447,18.364 26.283,20.2 TPJ14.1@26.35,20.2 27.05,20.9 27.05,27.535 P200.39@27.065,27.55
BOARD_ID_SDA: P200.40 TPJ15.1 U200.5 | length 13.3
  Bottom Layer w0.127: U200.5@24.2,18.95 24.2,19.2 24.438,19.438 25.113,19.438 25.654,19.979 25.654,20.729 26.35,21.425 TPJ15.1@26.35,22.8 26.35,24.775 26.657,25.082 26.657,26.006 26.425,26.238 26.425,29.075 27.065,29.715 P200.40@27.065,30.45
BOARD_ID_WP: R200.1 TPJ16.1 U200.7 | length 10.6
  Bottom Layer w0.127: U200.7@23.2,18.95 23.2,18.659 23.47,18.39 23.47,18.03 R200.1@23.7,17.8 23.724,17.776 23.724,9.351 24.25,8.825 TPJ16.1@24.25,8.75
GND: AT1.2 C1.1 C2.1 C3.1 C8.1 C9.2 C10.2 C11.2 C14.2 C102.2 C103.2 C106.2 C107.2 C110.2 C111.2 C112.2 C113.2 C114.2 C115.2 C116.2 C117.2 C124.2 C200.2 C201.2 C203.2 C205.2 C207.2 P1.2 P1.3 P1.4 P1.5 P2.2 P2.3 P200.2 P200.38 P201.1 P201.39 SH100.1 TP1.2 TPJ13.1 U1.0 U1.17 U1.18 U1.19 U1.37 U100.B2 U200.2 U200.3 U200.4 X1.2 X1.4 | length 67.7
  Top Layer w0.127: v1(4.475,15.175) 4.625,15.025 4.625,13.075 4.865,12.835 7.183,12.835 7.998,13.65 ; U1.0@9.848,17.75 v1(9.848,17.85)
  Top Layer w0.203: C124.2@14.198,9.85 14.648,10.3 U100.B2@14.648,11.074
  Top Layer w0.254: 7.998,13.65 U1.37@8.598,13.65 ; SH100.1@9.165,6.295 SH100.1@9.296,6.295 ; v1(9.296,5.004) SH100.1@9.296,6.295 ; v1@9.296,22.835 9.728,22.835 9.754,22.86 9.728,22.86 9.728,23.317 v1@9.652,23.393 ; v1(9.373,22.149) 9.373,22.136 C107.2@9.728,21.78 ; U1.0@11.1,19.101 U1.19@11.1,20.35 C1.1@11.1,21.184 ; v1(11.455,10.693) 11.455,11.155 C117.2@11.55,11.25 ; U1.0@11.6,19.032 U1.18@11.6,20.35 11.6,21.1 v1(11.608,21.107) ; v1@11.608,21.133 12.1,20.641 U1.17@12.1,20.35 U1.0@12.1,19.091 ; C110.2@12.198,9.85 12.238,9.81 12.2,9.772 12.268,9.704 v1(12.268,9.093) ; v1(14.986,5.004) 14.963,5.027 14.963,6.093 SH100.1@15.165,6.295 ; v1(20.863,4.988) 21.165,5.29 SH100.1@21.165,6.295 ; SH100.1@9.296,6.295 9.756,6.295 9.505,6.546 9.296,6.337 SH100.1@9.296,6.295
  Top Layer w0.3: C8.1@14.829,22.276 14.859,22.306 14.859,22.606 v1@14.986,22.733 ; X1.4@15.886,20.26 15.942,20.26 16.078,20.396 16.51,20.396 ; X1.4@15.921,20.366 C14.2@15.921,21.158
  Top Layer w0.305: v1(0.998,21.3) v1@0.998,21.35 ; C113.2@6.548,16.8 6.548,17.398 6.549,17.399 v1(6.693,17.399) ; v1(9.042,11.176) v1@9.116,11.176 ; v1(9.05,10.45) C115.2@9.747,10.45 ; v1@9.08,11.125 9.205,11.25 C111.2@9.848,11.25 C111.2@9.798,11.3 ; C115.2@9.747,10.451 C115.2@9.848,10.35 ; v1(10.554,10.668) 10.554,11.129 C116.2@10.675,11.25 ; v1@10.892,21.692 v1(10.871,21.692) 10.908,21.692 10.973,21.627 10.973,21.184 11.416,21.184 11.5,21.1 11.508,21.107 v1(11.608,21.107) ; v1@10.897,21.692 10.897,23.922 10.943,23.876 11.011,23.944 v1(11.011,23.99) ; v1(12.344,10.706) C114.2@12.344,11.202 ; v1@14.198,9.25 C124.2@14.198,9.85 ; v1@16.294,16.594 C103.2@16.324,16.624 ; v1(16.358,16.573) v1@16.358,16.591 ; C102.2@16.891,16.84 16.891,16.777 16.993,16.675 v1(16.993,16.332) ; C102.2@16.904,16.853 C102.2@16.98,16.777 ; SH100.1@28,30.95 v1(28,31)
  Top Layer w0.508: v1(6.909,21.044) 6.909,21.793 C106.2@7.214,22.098 ; v1(17.17,18.491) X1.2@17.17,19.05 ; X1.2@17.272,19.152 v1(17.882,19.152)
  Top Layer w0.635: v1(2,34.25) 1.475,34.25 ; P2.3@3.775,24.95 P2.3@4.225,24.95 ; v1(4.051,28.994) 4.051,28.126 4.05,28.125 P2.2@4.225,27.95 5.425,27.95 5.436,27.961 v1(5.436,29.007) ; v1(4.15,23.825) 4.15,24.875 P2.3@4.225,24.95 ; v1@5.15,17.9 C112.2@5.55,17.5 ; v1(5.766,25.197) 4.472,25.197 P2.3@4.225,24.95 ; 1.475,34.25 v1(1.1,34.25) 1.1,35.092 AT1.2@1.298,35.29 1.475,35.113 1.475,34.25
  Bottom Layer w0.254: C205.2@4.388,9.413 4.913,9.413 C205.2@4.938,9.438 ; v1@4.851,8.191 4.635,7.975 C201.2@4.375,7.975 4.604,8.204 4.617,8.191 4.63,8.204 v1(4.851,8.204)
  Bottom Layer w0.305: C203.2@4.375,8.725 C203.2@4.425,8.725 ; v1(4.851,8.826) 4.526,8.826 C203.2@4.425,8.725 ; v1@4.864,8.814 4.775,8.725 C203.2@4.425,8.725 ; U200.2@23.2,21.85 23.2,22.35 23.608,22.758 v1(23.711,22.758) 23.711,22.669 23.546,22.504 23.7,22.35 ; U200.3@23.7,21.85 23.7,22.35 ; 24.995,33.135 25.16,33.3 v1(25.725,33.3) ; v1(25.663,22.238) 25.638,22.238 25.25,21.85 C200.2@25.2,21.85 U200.4@24.2,21.85 24.2,22.479 23.7,22.479 23.7,22.35
  Bottom Layer w0.635: P201.1@2.9,3.25 2.95,3.2 v1(2.25,3.2) v1(2.25,3.8) 2.685,3.8 P201.1@2.935,3.55 ; P200.2@2.935,30.45 2.935,32.935 v1(3.25,33.25) ; C205.2@4.713,10.263 v1(5.563,10.263) ; v1(25.8,29.05) 25.8,30.445 P200.38@25.795,30.45 25.795,32.29 v1(25.825,32.319) ; P201.39@27.065,3.55 27.065,3.035 27.15,2.95 27.2,3 v1(27.8,3) v1(27.8,3.65) ; P201.39@27.065,3.55 27.165,3.65 v1(27.8,3.65) ; P201.39@27.065,3.55 27.7,3.55 v1(27.8,3.65)
  other v1: 1.948,1.05 4.848,1.05 5.798,1.05 6.748,1.05 7.698,1.05 8.598,1.05 9.498,1.05 10.348,1.05 11.198,1.05 12.098,1.05 12.998,1.05 13.898,1.05 14.748,1.05 15.648,1.05 16.498,1.05 17.348,1.05 18.198,1.05 19.048,1.05 19.948,1.05 20.798,1.05 21.698,1.05 22.598,1.05 23.498,1.05 24.398,1.05 25.248,1.05 26.148,1.05 27.098,1.05 27.998,1.05 28.948,1.05 0.998,1.1 28.948,2.35 0.998,2.5 28.948,3.6 0.998,3.8 0.998,6.25 28.948,6.4 28.948,7.7 0.998,7.85 26.75,8.25 18.644,8.433 28.948,8.85 14.2,9.25 0.998,9.3 25.25,9.75 26.75,9.75 28.948,9.9 2,10.25 24.511,10.414 27.994,10.5 0.998,10.9 28.948,10.9 25.25,11 26.75,11 25.971,11.709 28.948,12.05 0.998,12.25 26.75,12.25 28.948,13.15 0.998,13.55 26.962,13.589 25.222,14.059 28.948,14.25 0.998,14.85 28.948,15.25 9.85,15.35 10.6,15.35 11.35,15.35 12.1,15.35 12.85,15.35 26.75,16 0.998,16.15 9.855,16.18 10.592,16.18 11.354,16.18 12.09,16.18 12.852,16.18 28.948,16.35 1.996,16.5 27.994,16.5 23.025,16.815 24.333,16.84 9.848,17 10.598,17 11.348,17 12.098,17 12.848,17 28.948,17.4 0.998,17.45 26.75,17.5 10.598,17.85 11.348,17.85 12.098,17.85 12.848,17.85 5.15,18.15 28.948,18.45 0.998,18.7 9.848,18.7 10.598,18.7 11.348,18.7 12.098,18.7 12.848,18.7 25.75,19 26.75,19 3,19.15 28.948,19.55 24.587,19.888 0.998,20.05 3,20.35 28.948,20.6 16.459,21.133 3,21.5 17.31,21.501 28.948,21.7 17.335,22.314 1.996,22.475 27.994,22.525 0.998,22.55 4.102,22.708 3,22.75 24.75,22.75 14.961,22.784 10.897,22.809 28.948,22.8 9.284,22.873 9.627,23.419 0.998,23.8 11.938,23.825 28.948,23.95 14.808,23.978 9.576,24.219 24.75,24.25 25.75,24.25 14.376,24.536 0.998,25 13.03,24.994 10.82,25.044 28.948,25.05 23.571,25.705 6.833,25.756 8.865,25.794 14.376,25.806 24.75,26 19.685,26.048 20.663,26.086 21.875,26.076 10.211,26.111 0.998,26.15 13.03,26.162 28.948,26.2 0.998,27.5 28.948,27.55 2.149,27.999 27.851,28.08 13.741,28.804 12.471,28.829 19.494,28.981 20.815,28.981 6.8,29 9.1,29 11.62,29.007 21.95,29 24.7,29 27.05,29 29,30.4 1,30.45 1,31.4 29,31.4 1,32.25 1.996,32.294 4.05,32.294 27.25,32.294 8.2,32.3 10.45,32.3 13.95,32.3 21.165,32.305 29,32.35 1,33.2 2,33.25 4.55,33.25 7.1,33.25 8.2,33.25 9.325,33.25 10.45,33.25 11.55,33.25 12.75,33.25 13.825,33.25 14.95,33.25 15.875,33.25 16.95,33.25 17.95,33.25 19.05,33.25 20.05,33.25 21.025,33.25 21.95,33.275 26.6,33.3 27.5,33.3 28.3,33.3 29,33.3 21.4,34.225 22.35,34.225 2.825,34.233 3.9,34.233 6.55,34.233 7.6,34.233 8.725,34.233 9.825,34.233 10.975,34.233 12.15,34.233 13.2,34.233 14.375,34.233 15.4,34.233 16.35,34.233 17.375,34.233 18.475,34.233 19.475,34.233 20.475,34.233 26.15,34.25 27.05,34.25 27.85,34.25 28.65,34.25
NetAT1_1: AT1.1 R1.2 | length 9.8
  Top Layer w0.396: 5.643,33.432 5.705,33.37 ; 7.25,29.65 7.4,29.5
  Top Layer w0.457: AT1.1@5.184,35.29 5.184,34.54 ccw(c6.752,34.54) 5.643,33.432 ; 5.706,33.369 cw(c4.51,32.175) 6.2,32.175 6.2,31.69 ccw(c8.59,31.69) 6.9,30 7.4,29.5 9.5,27.407 R1.2@9.5,27.203
NetC1_2: C1.2 L1.1 U1.20 | length 1.4
  Top Layer w0.203: L1.1@10.312,21.641 10.312,21.285 10.414,21.184 10.414,21.057 10.6,20.871 U1.20@10.6,20.35
NetC2_2: C2.2 L1.2 L2.1 | length 0.9
  Top Layer w0.254: L1.2@10.262,22.393 10.262,23.262
NetC3_2: C3.2 L2.2 R1.1 R2.1 | length 2.7
  Top Layer w0.33: R1.1@9.518,26.482 9.518,25.386 10.262,24.642 L2.2@10.262,24.044
NetC4_1: C4.1 C12.2 L9.2 U1.14 | length 4.7
  Top Layer w0.254: v1@11.516,22.292 C12.2@11.516,22.809 ; v1(13.564,21.057) L9.2@13.564,21.615 ; L9.2@13.573,21.615 13.614,21.657 13.614,21.946 13.741,22.073 C4.1@13.741,22.2 ; U1.14@13.6,20.35 v1@13.6,20.944
  Signal Layer 3 w0.152: v1(11.506,22.25) 11.525,22.239 v1(13.564,21.057)
NetC4_2: C4.2 C9.1 L6.2 L10.1 | length 4.4
  Top Layer w0.254: C9.1@13.691,23.952 13.691,23.927 13.691,23.901 C9.1@13.691,23.876 ; C9.1@13.716,23.948 L6.2@13.716,24.486 ; C4.2@13.741,22.754 C9.1@13.741,23.901 ; 13.741,23.343 15.164,23.343 15.519,22.987 15.519,22.377 L10.1@15.443,22.301
NetC5_1: C5.1 L4.1 | length 0.5
  Top Layer w0.254: L4.1@12.629,22.319 C5.1@12.629,22.774
NetC5_2: C5.2 C14.1 L5.2 L10.2 U1.13 | length 5.3
  Top Layer w0.254: C5.2@12.675,23.308 12.741,23.241 13.106,23.241 v1(13.157,23.19) v1@13.183,23.165 ; U1.13@14.1,20.35 v1@14.1,20.933 ; v1(14.224,21.057) v1@14.326,21.057 ; v1@14.3,21.107 14.723,21.107 L5.2@14.783,21.168 ; L5.2@14.732,21.168 L5.2@14.783,21.168 ; C14.1@15.351,21.168 L5.2@14.783,21.168 ; C14.1@15.371,21.158 15.418,21.205 L10.2@15.418,21.641
  Signal Layer 3 w0.152: v1@13.132,23.19 13.137,23.18 13.157,23.141 v1(14.224,21.057)
NetC7_1: C7.1 C11.1 L7.1 | length 1.1
  Top Layer w0.254: L7.1@13.716,26.813 C11.1@13.716,27.335 13.716,27.386 C7.1@14.254,27.386
NetC8_2: C8.2 L3.1 L5.1 L9.1 | length 4.7
  Top Layer w0.254: L3.1@12.294,24.46 12.649,24.46 12.7,24.409 12.675,24.384 v1(12.675,24.333) ; L9.1@14.062,21.641 L5.1@14.681,21.641 ; L9.1@14.279,21.671 C8.2@14.279,22.276 v1@14.279,22.754
  Signal Layer 3 w0.254: v1(12.675,24.333) 13.056,24.333 14.3,23.089 v1(14.3,22.784)
NetC10_1: C10.1 L6.1 L7.2 | length 1.1
  Top Layer w0.254: L6.1@13.716,25.086 L7.2@13.716,26.213
NetC12_1: C12.1 L8.1 | length 0.6
  Top Layer w0.254: L8.1@12.065,22.271 C12.1@12.065,22.835
NetC102_1: C102.1 C103.1 L102.2 U1.9 | length 3.2
  Top Layer w0.254: U1.9@14.7,18.25 15.1,18.25 15.519,17.831 C103.1@16.18,17.831 ; C103.1@16.231,17.798 16.935,17.798 16.942,17.805 L102.2@17.805,17.805
NetC112_1: C112.1 C113.1 R100.2 U1.34 | length 3.7
  Top Layer w0.254: C113.1@6.548,15.9 6.667,15.781 6.667,15.443 6.998,15.113 7.417,15.113 7.554,15.25 U1.34@8,15.25
  Top Layer w0.305: R100.2@4.85,15.9 C113.1@6.548,15.9
NetC117_1: C117.1 U1.41 | length 1.8
  Top Layer w0.254: U1.41@10.598,13.65 10.598,13.1 C117.1@11.498,12.2
NetL4_2: L4.2 L11.2 U1.15 | length 1.3
  Top Layer w0.152: L4.2@12.649,21.692 12.649,21.666 12.827,21.488 12.827,21.25 L11.2@12.945,21.133 ; U1.15@13.056,20.394 L11.2@13.056,20.996
NetL8_2: L8.2 L11.1 U1.16 | length 1.4
  Top Layer w0.152: L8.2@12.141,21.666 12.141,21.396 L11.1@12.405,21.133 ; L11.1@12.425,21.153 12.548,21.031 U1.16@12.548,20.402
NetL100_1: L100.1 U1.38 | length 2.7
  Top Layer w0.254: L100.1@7.438,11.992 8.067,11.992 9.098,13.023 U1.38@9.1,13.65
NetL101_2: L101.2 R100.1 | length 1.3
  Top Layer w0.305: L101.2@3.55,17.465 3.958,17.057 4.293,17.057 R100.1@4.55,16.8
NetP2_1: P2.1 R2.2 | length 2.8
  Top Layer w0.396: P2.1@5.825,26.45 P2.1@5.867,26.492
  Top Layer w0.457: P2.1@5.867,26.492 8.6,26.492
NetU1_10: U1.10 X1.3 | length 3.8
  Top Layer w0.127: U1.10@14.7,18.75 15.184,18.75 15.367,18.567 16.383,18.567 16.586,18.771 16.586,19.66 X1.3@17.2,20.273
NetU1_11: U1.11 X1.1 | length 1
  Top Layer w0.127: U1.11@14.698,19.25 U1.11@14.7,19.25 X1.1@15.748,19.25
PAVDD: L103.1 R210.1 R211.1 | length 13
  Top Layer w0.635: v1(6.2,21.9) v1(6.2,22.45) 6.2,22.95 L103.1@6.35,23.1
  Signal Layer 3 w0.635: v1(4.15,13.55) v1(4.15,14.15) 4.202,14.15 4.382,13.97 5.625,15.214 5.625,17.322 6.54,18.237 6.54,19.736 6.2,20.077 v1(6.2,21.9) v1(6.2,22.45)
  Bottom Layer w0.635: v1(4.15,14.15) v1(4.15,13.55) 4.15,13.225 R210.1@4.4,12.975
RADIO_PA0: P200.19 P201.12 TPJ5.1 U1.25 | length 46.2
  Top Layer w0.127: v1@7.5,20 7.75,19.75 U1.25@8,19.75
  Signal Layer 3 w0.127: v1(7.3,20.1) 7.3,20.279 7.798,20.777 8.423,20.777 8.814,21.168 8.814,21.755 7.239,23.33 7.239,24.016 8.344,25.121 8.344,25.933 9.106,26.695 14.453,26.695 v1(14.91,26.238)
  Bottom Layer w0.127: v1(7.3,20.1) 7.257,20.1 6.788,19.631 6.788,19.238 8.153,17.873 8.153,15.202 7.379,14.427 7.379,9.131 9.125,7.385 P201.12@9.125,7.2 ; P201.12@9.285,6.45 P201.12@9.285,7.09 ; v1@14.961,26.213 14.365,26.808 P200.19@14.365,27.55 14.365,28.183 14.935,28.753 16.053,28.753 16.307,28.499 16.307,25.298 17.539,24.066 17.539,23.622 17.821,23.339 17.821,21.352 16.169,19.7 TPJ5.1@15.55,19.7
RADIO_PA1: P200.20 P201.14 TPJ6.1 U1.26 | length 49
  Top Layer w0.127: v1(7.298,19.45) 7.498,19.25 U1.26@8,19.25
  Signal Layer 3 w0.127: v1(7.298,19.45) 7.703,19.45 9.017,18.136 9.017,15.138 9.512,14.643 13.157,14.643 16.218,17.704 19.196,17.704 v1@19.412,17.488 ; v1(14.427,29.007) 14.427,28.956 14.91,28.473 15.596,28.473 17.272,26.797 17.272,25.705 18.821,24.155 v1@18.821,23.66
  Bottom Layer w0.127: v1(7.298,19.45) 8.42,18.328 8.42,15.075 7.645,14.3 7.645,11.024 8.915,9.754 8.915,8.255 9.47,7.7 10.025,7.7 P201.14@10.4,7.325 ; P200.20@14.365,31.165 P200.20@14.365,30.45 14.365,29.094 v1@14.453,29.007 ; v1(18.821,23.635) 18.948,23.508 TPJ6.1@18.948,22.085 ; TPJ6.1@19.02,21.92 TPJ6.1@19.02,22.07 ; TPJ6.1@19.088,21.92 19.241,21.768 19.241,20.726 20.002,19.964 20.002,19.139 19.177,18.313 v1(19.177,17.513)
RADIO_PA2: P200.21 P201.3 TPJ7.1 U1.27 | length 49.2
  Top Layer w0.127: v1(4.825,19.625) 5.126,19.926 6.174,19.926 7.35,18.75 U1.27@8,18.75
  Signal Layer 3 w0.127: v1(4.825,19.625) 5.182,19.982 5.182,23.427 7.315,25.56 7.315,26.391 8.636,27.711 15.212,27.711 16.497,26.426 16.497,24.79 16.942,24.346 v1(16.942,23.749)
  Bottom Layer w0.127: P201.3@4.102,4.381 3.518,4.966 2.68,4.966 2.286,5.359 2.286,5.651 1.475,6.462 1.475,13.445 2.625,14.595 2.625,16.5 4.825,18.7 v1(4.825,19.625) ; P200.21@15.635,27.55 15.635,26.885 15.951,26.568 15.951,25.286 16.942,24.295 v1(16.942,23.749) 16.993,23.749 16.51,23.266 TPJ7.1@16.51,22.047